# Altium PCB Kasli-DIOT.PCBDOC (part 12 of 23)
Units mm, origin at the board's own origin, x right, y up, seen from the top; angles counter-clockwise.
Board outline 222.9 x 100 mm, 10 copper layers (TopLayer, Layer 2, Layer 3, Layer 4, Layer 5, Layer 6, Layer 7, layer 8, Layer 9, BottomLayer), stack 1.564 mm thick; 977 components, 900 nets, 4676 pads, 2725 vias.
Unrouted connection lines stored in the file: 17.
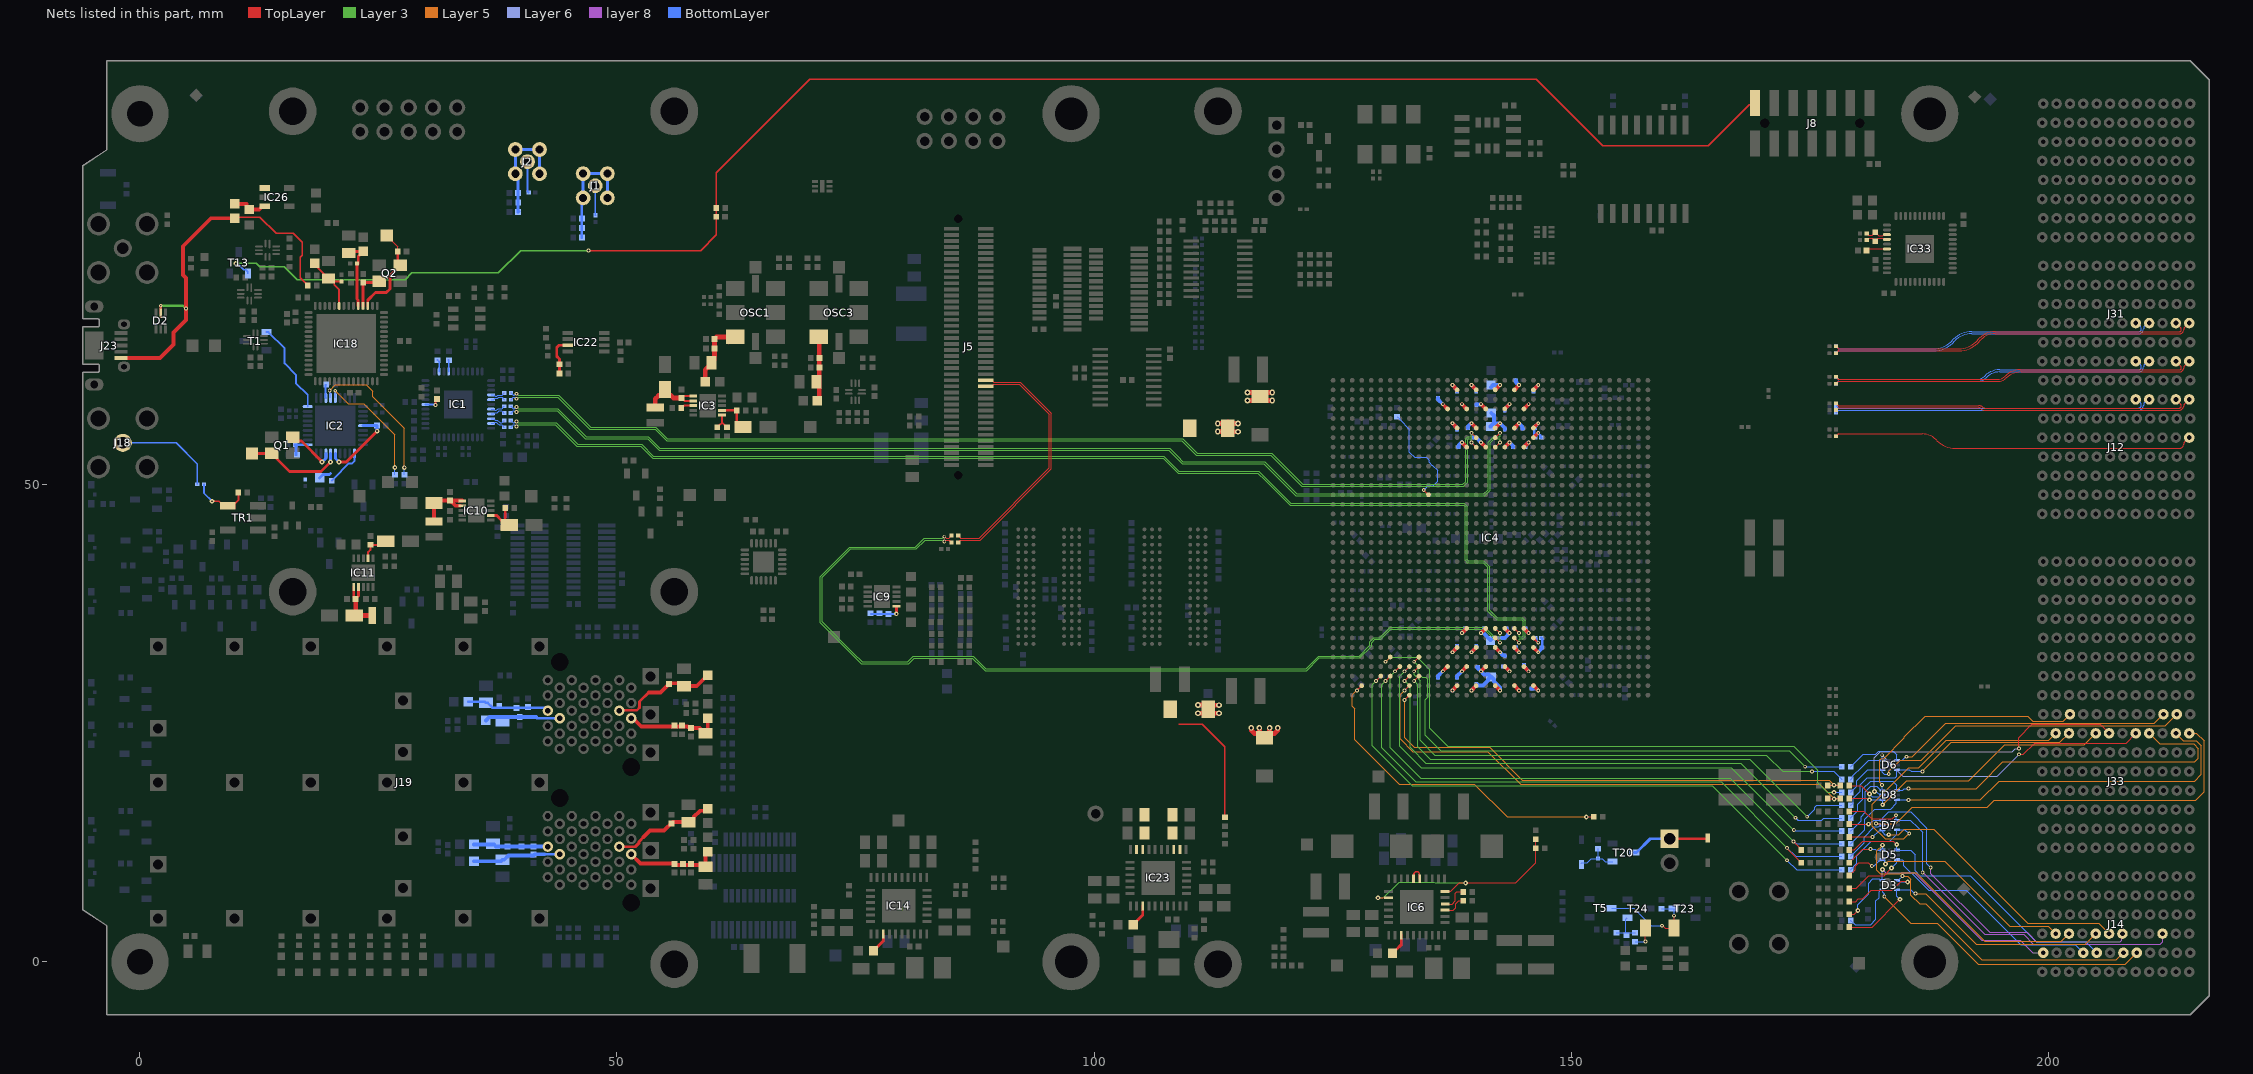
[diagram p18: the nets of this part, all layers, seen from the top]

## Via types
v1: diameter 0.4, hole 0.2, TopLayer to BottomLayer, tented both sides, 1723 vias
v2: diameter 0.5, hole 0.2, TopLayer to BottomLayer, tented both sides, 524 vias
v3: diameter 0.6, hole 0.3, TopLayer to BottomLayer, tented both sides, 172 vias
v4: diameter 0.6, hole 0.3, TopLayer to BottomLayer, 113 vias
v5: diameter 0.5, hole 0.2, TopLayer to BottomLayer, 107 vias
v6: diameter 0.4, hole 0.2, TopLayer to BottomLayer, 67 vias
v7: diameter 0.5, hole 0.25, TopLayer to BottomLayer, tented both sides, 12 vias
v8: diameter 0.8, hole 0.5, TopLayer to BottomLayer, tented both sides, 7 vias

## Nets (pads, with @x,y where several pads share a name; then routed paths per layer and width w, separated by ;. In a path a pad name is that pad's centre, name@x,y a point inside that pad or via, vN(x,y) a via of type N, cw(c..) or ccw(c..) an arc to the next point about the centre after c; other vN are vias at no path point) (continued)
MGT5_Tx_P: C142.2 J12.A5 | length 38.1
  TopLayer w0.095: C142.2@177.786,55.083 ccw(c177.786,55.143) 177.829,55.1 C142.2@177.95,55.221 ; C142.2@177.95,55.221 ccw(c177.916,55.255) 177.964,55.255 cw(c178.011,55.255) 177.978,55.289 cw(c178.078,55.188) 178.078,55.33 186.8,55.33 cw(c186.8,53.264) 188.261,54.725 188.349,54.637 ccw(c190.301,56.588) 190.301,53.828 213.797,53.828 ccw(c213.797,54.242) 214.211,54.242 cw(c214.498,54.242) 214.295,54.445 J12.A5@214.8,54.95
MGT6_RxC_N: C440.1 J12.E7 | length 33.2
  BottomLayer w0.095: C440.1@177.786,58.275 177.811,58.275 177.964,58.122 177.964,58.106 178.019,58.05 209.489,58.05 ccw(c209.489,58.35) 209.789,58.35 ccw(c209.35,58.35) 209.66,58.66 209.491,58.829 ccw(c209.2,58.538) J12.E7@209.2,58.95
MGT6_RxC_P: C436.1 J12.D7 | length 33.6
  BottomLayer w0.095: C436.1@177.786,57.565 177.811,57.565 177.986,57.74 177.986,57.772 178.042,57.828 209.489,57.828 ccw(c209.489,58.35) 210.011,58.35 cw(c210.449,58.35) 210.139,58.66 210.308,58.829 cw(c210.6,58.538) J12.D7@210.6,58.95
MGT6_Tx_N: C233.2 J12.B7 | length 37.4
  TopLayer w0.095: C233.2@177.786,58.55 177.811,58.55 177.964,58.398 177.964,58.362 178.019,58.306 192.739,58.306 cw(c192.739,57.805) 193.093,58.159 ; 193.094,58.159 ccw(c193.356,58.422) 193.356,58.05 213.797,58.05 ccw(c213.797,58.242) 213.989,58.242 ccw(c213.701,58.242) 213.905,58.445 J12.B7@213.4,58.95
MGT6_Tx_P: C229.2 J12.A7 | length 37.8
  TopLayer w0.095: C229.2@177.786,57.84 177.811,57.84 177.964,57.993 177.964,58.029 178.019,58.084 192.738,58.084 cw(c192.738,57.803) 192.937,58.002 192.938,58.001 ccw(c193.354,58.417) 193.354,57.828 213.797,57.828 ccw(c213.797,58.242) 214.211,58.242 cw(c214.498,58.242) 214.295,58.445 J12.A7@214.8,58.95
MGT7_RxC_N: C447.1 J31.E1 | length 33.5
  BottomLayer w0.095: C447.1@177.786,61.325 cw(c177.786,61.265) 177.829,61.307 177.948,61.188 cw(c177.911,61.151) 177.964,61.151 ccw(c178.016,61.151) 177.979,61.114 ccw(c178.076,61.211) 178.076,61.074 192.573,61.074 ccw(c192.573,62.188) 193.361,61.4 ; 193.361,61.4 cw(c194.93,59.832) 194.93,62.05 209.489,62.05 ccw(c209.489,62.35) 209.789,62.35 ccw(c209.35,62.35) 209.66,62.66 209.491,62.829 ccw(c209.2,62.538) J31.E1@209.2,62.95
MGT7_RxC_P: C445.1 J31.D1 | length 33.8
  BottomLayer w0.095: C445.1@177.786,60.6 ccw(c177.786,60.66) 177.829,60.618 177.948,60.737 ccw(c177.911,60.774) 177.964,60.774 cw(c178.016,60.774) 177.979,60.811 cw(c178.076,60.714) 178.076,60.852 192.574,60.852 ccw(c192.574,62.186) 193.517,61.242 ; 193.518,61.243 cw(c194.93,59.831) 194.93,61.828 209.489,61.828 ccw(c209.489,62.35) 210.011,62.35 cw(c210.449,62.35) 210.139,62.66 210.308,62.829 cw(c210.6,62.538) J31.D1@210.6,62.95
MGT7_Tx_N: C443.2 J31.B1 | length 37.6
  TopLayer w0.095: C443.2@177.786,61.325 177.811,61.325 177.964,61.173 177.964,61.129 178.019,61.074 194.737,61.074 ccw(c194.737,62.155) 195.501,61.39 cw(c197.094,59.797) 197.094,62.05 213.797,62.05 ccw(c213.797,62.242) 213.989,62.242 ccw(c213.701,62.242) 213.905,62.445 J31.B1@213.4,62.95
MGT7_Tx_P: C441.2 J31.A1 | length 38
  TopLayer w0.095: C441.2@177.786,60.6 177.811,60.6 177.964,60.753 177.964,60.796 178.019,60.852 194.829,60.852 ccw(c194.829,61.933) 195.593,61.168 cw(c197.186,59.575) 197.186,61.828 213.797,61.828 ccw(c213.797,62.242) 214.211,62.242 cw(c214.498,62.242) 214.295,62.445 J31.A1@214.8,62.95
MGT8_RxC_N: C448.1 J31.E3 | length 33.7
  BottomLayer w0.095: C448.1@177.786,64.525 cw(c177.786,64.465) 177.829,64.507 177.945,64.391 cw(c177.901,64.346) 177.964,64.346 ccw(c178.026,64.346) 177.982,64.302 ccw(c178.072,64.392) 178.072,64.265 188.035,64.265 ccw(c188.035,66.805) 189.831,65.009 190.064,65.242 cw(c192.015,63.291) 192.015,66.05 209.489,66.05 ccw(c209.489,66.35) 209.789,66.35 ccw(c209.35,66.35) 209.66,66.66 209.491,66.829 ccw(c209.2,66.538) J31.E3@209.2,66.95
MGT8_RxC_P: C446.1 J31.D3 | length 34.1
  BottomLayer w0.095: C446.1@177.786,63.782 ccw(c177.786,63.843) 177.829,63.8 177.945,63.916 ccw(c177.901,63.961) 177.964,63.961 cw(c178.026,63.961) 177.982,64.005 cw(c178.072,63.916) 178.072,64.043 188.035,64.043 ccw(c188.035,66.803) 189.987,64.851 190.22,65.084 cw(c192.016,63.288) 192.016,65.828 209.489,65.828 ccw(c209.489,66.35) 210.011,66.35 cw(c210.449,66.35) 210.139,66.66 210.308,66.829 cw(c210.6,66.538) J31.D3@210.6,66.95
MGT8_Tx_N: C444.2 J31.B3 | length 37.9
  TopLayer w0.095: C444.2@177.786,64.525 cw(c177.786,64.465) 177.829,64.507 177.945,64.391 cw(c177.901,64.346) 177.964,64.346 ccw(c178.026,64.346) 177.982,64.302 ccw(c178.072,64.392) 178.072,64.265 190.66,64.265 ccw(c190.66,66.805) 192.456,65.009 192.804,65.357 cw(c194.476,63.685) 194.476,66.05 213.797,66.05 ccw(c213.797,66.242) 213.989,66.242 ccw(c213.701,66.242) 213.905,66.445 J31.B3@213.4,66.95
MGT8_Tx_P: C442.2 J31.A3 | length 38.3
  TopLayer w0.095: C442.2@177.786,63.782 ccw(c177.786,63.843) 177.829,63.8 177.945,63.916 ccw(c177.901,63.961) 177.964,63.961 cw(c178.026,63.961) 177.982,64.005 cw(c178.072,63.916) 178.072,64.043 190.661,64.043 ccw(c190.661,66.802) 192.612,64.851 192.961,65.2 cw(c194.477,63.684) 194.477,65.828 213.797,65.828 ccw(c213.797,66.242) 214.211,66.242 cw(c214.498,66.242) 214.295,66.445 J31.A3@214.8,66.95
MGT_CLK1.CLK_N: C402.2 IC4.AH20 | length 124.6
  TopLayer w0.095: IC4.AH20@144.061,33.95 v1(144.561,33.45)
  Layer 3 w0.075: v1(39.461,56.645) 39.505,56.645 39.667,56.483 43.633,56.483 45.89,54.225 52.586,54.225 53.805,53.006 105.511,53.006 107.316,53.006 108.279,52.043 108.897,51.425 117.272,51.425 117.97,50.727 120.645,48.052 122.759,48.052 135.345,48.052 138.82,48.052 138.929,47.943 139.111,47.761 139.111,42.15 139.161,42.1 139.209,42.052 140.87,42.052 141.029,41.893 141.486,41.436 141.486,36.852 142.286,36.052 144.895,36.052 145.079,35.868 145.197,35.75 145.197,34.084 144.961,33.849 144.605,33.849 144.561,33.805 v1(144.561,33.45)
  BottomLayer w0.095: C402.2@38.878,56.732 38.903,56.732 39.056,56.579 39.056,56.548 39.112,56.493 39.253,56.493 39.405,56.645 v1(39.461,56.645)
MGT_CLK1.CLK_P: C401.2 IC4.AG20 | length 123.9
  TopLayer w0.095: IC4.AG20@144.061,34.95 v1(144.561,34.45)
  Layer 3 w0.075: v1(39.461,56.118) 39.505,56.118 39.667,56.281 43.549,56.281 45.807,54.023 52.502,54.023 53.722,52.804 107.232,52.804 108.813,51.223 117.188,51.223 117.886,50.525 120.561,47.85 122.675,47.85 135.261,47.85 138.736,47.85 138.909,47.677 138.909,42.066 139.125,41.85 140.786,41.85 141.284,41.352 141.284,36.768 142.202,35.85 144.811,35.85 144.995,35.667 144.995,34.168 144.877,34.051 144.605,34.051 144.561,34.095 v1(144.561,34.45)
  BottomLayer w0.095: C401.2@38.878,56.032 38.903,56.032 39.056,56.184 39.056,56.215 39.112,56.271 39.253,56.271 39.405,56.118 v1(39.461,56.118)
MGT_CLK1_C_N: C402.1 IC1.42 | length 1.7
  BottomLayer w0.095: IC1.42@36.811,56.928 37.105,56.928 37.244,56.789 37.453,56.789 37.69,56.552 37.69,56.548 37.746,56.493 37.945,56.493 38.001,56.548 38.001,56.579 38.153,56.732 C402.1@38.178,56.732
MGT_CLK1_C_P: C401.1 IC1.43 | length 1.7
  BottomLayer w0.095: IC1.43@36.811,56.428 37.105,56.428 37.244,56.567 37.361,56.567 37.468,56.46 37.468,56.456 37.654,56.271 37.945,56.271 38.001,56.215 38.001,56.184 38.153,56.032 C401.1@38.178,56.032
MGT_CLK2.CLK_N: C14.2 IC4.G18 | length 114.1
  TopLayer w0.095: IC4.G18@142.061,54.95 v1(142.561,55.45)
  Layer 3 w0.075: v1(39.461,58.142) 39.505,58.142 39.667,57.98 43.806,57.98 46.761,55.025 53.286,55.025 54.505,53.806 107.136,53.806 107.916,53.806 108.754,52.968 109.322,52.4 117.897,52.4 118.245,52.052 121.247,49.05 123.361,49.05 140.861,49.05 141.309,49.498 141.309,54.483 141.877,55.051 142.517,55.051 142.561,55.095 v1(142.561,55.45)
  BottomLayer w0.095: C14.2@38.878,58.232 38.903,58.232 39.056,58.079 39.056,58.045 39.112,57.99 39.253,57.99 39.405,58.142 v1(39.461,58.142)
MGT_CLK2.CLK_P: C5.2 IC4.H18 | length 114.1
  TopLayer w0.095: IC4.H18@142.061,53.95 v1(142.561,54.45)
  Layer 3 w0.075: v1(39.461,57.615) 39.505,57.615 39.667,57.778 43.723,57.778 46.677,54.823 53.202,54.823 54.422,53.604 107.832,53.604 109.238,52.198 117.813,52.198 118.161,51.85 121.163,48.848 126.361,48.848 140.945,48.848 141.511,49.414 141.511,54.399 141.961,54.849 142.517,54.849 142.561,54.805 v1(142.561,54.45)
  BottomLayer w0.095: C5.2@38.878,57.526 38.903,57.526 39.056,57.678 39.056,57.712 39.112,57.768 39.253,57.768 39.405,57.615 v1(39.461,57.615)
MGT_CLK2_C_N: C14.1 IC1.40 | length 1.6
  BottomLayer w0.095: IC1.40@36.811,57.928 37.105,57.928 37.244,57.789 37.361,57.789 37.561,57.99 37.945,57.99 38.001,58.045 38.001,58.079 38.153,58.232 C14.1@38.178,58.232
MGT_CLK2_C_P: C5.1 IC1.41 | length 1.6
  BottomLayer w0.095: IC1.41@36.811,57.428 37.105,57.428 37.244,57.567 37.453,57.567 37.653,57.768 37.945,57.768 38.001,57.712 38.001,57.678 38.153,57.526 C5.1@38.178,57.526
MGT_CLK3.CLK_N: C479.2 IC4.G16 | length 110.6
  TopLayer w0.095: v1(139.561,55.45) IC4.G16@140.061,54.95
  Layer 3 w0.075: v1(39.461,59.544) 39.505,59.544 39.667,59.381 43.89,59.381 47.247,56.025 54.072,56.025 55.291,54.806 64.268,54.806 65.558,54.806 65.584,54.807 cw(c65.589,54.733) 65.606,54.806 65.692,54.806 65.854,54.806 108.061,54.806 109.291,54.806 110.029,54.068 110.797,53.3 118.611,53.3 121.872,50.039 138.666,50.039 138.959,50.333 138.959,54.846 139.164,55.051 139.517,55.051 139.561,55.095 v1(139.561,55.45)
  BottomLayer w0.095: C479.2@38.883,59.637 38.908,59.637 39.06,59.484 39.06,59.447 39.116,59.391 39.253,59.391 39.405,59.544 v1(39.461,59.544)
MGT_CLK3.CLK_P: C421.2 IC4.H16 | length 110.6
  TopLayer w0.095: v1(139.561,54.45) IC4.H16@140.061,53.95
  Layer 3 w0.075: v1(39.461,59.017) 39.505,59.017 39.667,59.179 43.807,59.179 47.163,55.823 53.988,55.823 55.207,54.604 65.558,54.604 108.061,54.604 109.207,54.604 109.957,53.854 110.713,53.098 118.527,53.098 121.788,49.837 138.749,49.837 139.161,50.249 139.161,54.762 139.248,54.849 139.517,54.849 139.561,54.805 v1(139.561,54.45)
  BottomLayer w0.095: C421.2@38.883,58.924 38.908,58.924 39.06,59.077 39.06,59.114 39.116,59.169 39.253,59.169 39.405,59.017 v1(39.461,59.017)
MGT_CLK3_C_N: C479.1 IC1.37 | length 1.6
  BottomLayer w0.095: IC1.37@36.811,59.428 37.105,59.428 37.244,59.289 37.406,59.289 37.508,59.391 37.95,59.391 38.005,59.447 38.005,59.484 38.158,59.637 C479.1@38.183,59.637
MGT_CLK3_C_P: C421.1 IC1.38 | length 1.6
  BottomLayer w0.095: IC1.38@36.811,58.928 37.105,58.928 37.244,59.067 37.498,59.067 37.6,59.169 37.95,59.169 38.005,59.114 38.005,59.077 38.158,58.924 C421.1@38.183,58.924
MGT_CLK_ext_C_N: C395.2 IC4.AH18 | length 97.8
  TopLayer w0.095: v6(84.311,44.562) 84.38,44.562 84.519,44.423 84.828,44.423 84.883,44.479 84.883,44.518 85.036,44.671 C395.2@85.061,44.671 ; IC4.AH18@142.061,33.95 v1(142.561,33.45)
  Layer 3 w0.075: v6(84.311,44.562) 84.254,44.562 84.105,44.413 82.213,44.413 81.277,43.477 74.402,43.477 71.309,40.384 71.309,35.541 74.768,32.082 75.602,31.248 80.559,31.248 81.151,31.84 87.26,31.84 88.068,31.032 88.577,30.523 122.309,30.523 123.634,31.848 127.875,31.848 129.1,33.074 129.1,33.467 129.421,33.787 130.049,33.787 131.111,34.85 140.884,34.85 141.885,33.849 142.11,33.849 142.517,33.849 142.561,33.805 v1(142.561,33.45)
MGT_CLK_ext_C_P: C394.2 IC4.AG18 | length 97.2
  TopLayer w0.095: v6(84.311,44.062) 84.38,44.062 84.519,44.201 84.828,44.201 84.883,44.145 84.883,44.106 85.036,43.953 C394.2@85.061,43.953 ; IC4.AG18@142.061,34.95 v1(142.561,34.45)
  Layer 3 w0.075: v6(84.311,44.062) 84.254,44.062 84.105,44.211 82.297,44.211 81.361,43.275 74.486,43.275 71.511,40.3 71.511,35.625 74.768,32.368 75.686,31.45 80.475,31.45 81.068,32.042 87.344,32.042 88.068,31.318 88.661,30.725 122.225,30.725 123.55,32.05 127.791,32.05 128.898,33.158 128.898,33.55 129.338,33.99 129.965,33.99 131.027,35.052 140.968,35.052 141.969,34.051 142.194,34.051 142.517,34.051 142.561,34.095 v1(142.561,34.45)
MGT_CLK_ext_N: C395.1 J5.53 | length 26.4
  TopLayer w0.095: C395.1@85.761,44.671 85.786,44.671 85.938,44.518 85.938,44.479 85.994,44.423 87.97,44.423 95.311,51.764 95.311,57.4 92.182,60.529 89.467,60.529 89.261,60.323 J5.53@88.661,60.323
MGT_CLK_ext_P: C394.1 J5.51 | length 27.1
  TopLayer w0.095: C394.1@85.761,43.953 85.786,43.953 85.938,44.106 85.938,44.145 85.994,44.201 88.062,44.201 95.533,51.672 95.533,57.492 92.274,60.751 89.467,60.751 89.261,60.958 J5.51@88.661,60.958
MGTAVCC: C303.2 C304.2 C385.2 C386.2 FB3.1 FB4.1 IC23.8 IC23.9 IC23.14 IC23.15 R5.2 | length 13.2
  TopLayer w0.15: 108.886,24.9 111.361,24.9 113.711,22.55 R5.2@113.711,15.17
MGTAVCC_G10: C50.2 C320.2 C322.2 C323.2 C324.2 C325.2 C326.2 C327.2 C330.2 C331.2 FB3.2 IC4.AG15 IC4.AG17 IC4.AG19 IC4.AG21 IC4.AJ14 IC4.AJ16 IC4.AJ18 IC4.AJ20 | length 23.1
  TopLayer w0.4: v1(137.561,32.45) IC4.AJ14@138.061,32.95 ; v1(138.561,34.45) IC4.AG15@139.061,34.95 ; v1(139.561,32.45) IC4.AJ16@140.061,32.95 ; v1(140.561,34.45) IC4.AG17@141.061,34.95 ; IC4.AJ18@142.061,32.95 v1(142.561,32.45) ; IC4.AG19@143.061,34.95 v1(143.561,34.45) ; IC4.AJ20@144.061,32.95 v1(144.561,32.45) ; IC4.AG21@145.061,34.95 v1(145.561,34.45)
  TopLayer w0.5: v3(110.894,26.061) FB3.2@111.694,26.061 ; v3(110.894,26.911) FB3.2@111.694,26.911 ; FB3.2@112.311,26.052 v3(113.111,26.052) ; FB3.2@112.311,26.902 v3(113.111,26.902)
  BottomLayer w0.4: v3(110.894,26.061) 111.37,26.061 111.659,26.35 111.661,26.35 C50.2@111.936,26.625 ; v3(110.894,26.911) 110.932,26.872 111.689,26.872 C50.2@111.936,26.625 ; v3(113.111,26.052) 112.527,26.052 112.23,26.35 112.211,26.35 C50.2@111.936,26.625 ; v3(113.111,26.902) 112.566,26.902 112.564,26.9 112.211,26.9 C50.2@111.936,26.625 ; v1(137.561,32.45) 138.061,32.95 C331.2@138.061,33.1 ; v1(138.561,34.45) 138.886,34.775 138.886,34.95 C330.2@138.911,34.95 ; v1(139.561,32.45) 140.088,32.977 C322.2@140.088,33.1 ; v1(140.561,34.45) 140.813,34.45 C320.2@141.563,33.7 141.813,33.95 143.061,33.95 v1(143.561,34.45) 143.236,34.775 143.236,34.95 C326.2@143.211,34.95 ; v1@140.699,34.563 140.886,34.75 140.886,34.95 C327.2@140.911,34.95 ; v1(142.561,32.45) 142.886,32.125 143.061,32.125 C324.2@143.061,32.1 ; C323.2@144.226,32.935 144.226,32.785 v1(144.561,32.45) ; C325.2@145.211,34.95 145.236,34.95 145.236,34.775 v1(145.561,34.45)
MGTAVCC_G11: C319.2 C332.2 C340.2 C341.2 C342.2 C343.2 C344.2 C345.2 C349.2 C350.2 FB4.2 IC4.F14 IC4.F16 IC4.F18 IC4.F20 IC4.H15 IC4.H17 IC4.H19 IC4.H21 | length 18
  TopLayer w0.4: v1(137.561,56.45) IC4.F14@138.061,55.95 ; v1(138.561,54.45) IC4.H15@139.061,53.95 ; v1(139.561,56.45) IC4.F16@140.061,55.95 ; v1(140.561,54.45) IC4.H17@141.061,53.95 ; IC4.F18@142.061,55.95 v1(142.561,56.45) ; IC4.H19@143.061,53.95 v1(143.561,54.45) ; IC4.F20@144.061,55.95 v1(144.561,56.45) ; IC4.H21@145.061,53.95 v1(145.561,54.45)
  TopLayer w0.5: v3(112.969,55.586) FB4.2@113.769,55.586 ; v3(112.969,56.436) FB4.2@113.769,56.436 ; FB4.2@114.036,56.575 114.184,56.427 FB4.2@114.386,56.427 ; FB4.2@114.303,55.564 v3(115.103,55.564) ; FB4.2@114.303,56.414 v3(115.103,56.414) ; FB4.2@114.386,55.577 FB4.2@114.386,56.065
  BottomLayer w0.4: v1(137.561,56.45) 138.061,55.95 C344.2@138.061,55.8 ; C340.2@138.211,53.95 138.236,53.95 138.236,54.162 v1@138.551,54.477 ; C350.2@139.211,55.956 139.211,56.131 139.53,56.45 v1(139.561,56.45) ; C345.2@139.811,54.95 140.061,54.95 v1(140.561,54.45) ; C332.2@141.561,56.1 C332.2@141.836,56.375 ; C319.2@141.636,57.525 141.911,57.25 141.911,56.45 v1(142.561,56.45) 143.061,55.95 C349.2@143.061,55.8 ; v1(143.561,54.45) 143.736,54.274 143.886,54.124 143.886,53.95 C341.2@143.911,53.95 ; v1(144.561,56.45) 144.883,56.128 144.883,55.881 C343.2@144.908,55.881 ; C342.2@145.211,53.99 145.211,54.126 145.535,54.45 v1(145.561,54.45)
MGTAVTT_G10: C97.2 C101.2 C112.2 C113.2 C114.2 C115.2 C116.2 C328.2 C329.2 FB2.2 IC4.AJ22 IC4.AL13 IC4.AL15 IC4.AL17 IC4.AL19 IC4.AL21 IC4.AN14 IC4.AN16 IC4.AN18 IC4.AN20 IC4.AN22 R160.2 | length 24.5
  TopLayer w0.4: v1(136.561,30.45) IC4.AL13@137.061,30.95 ; v1(137.561,28.45) IC4.AN14@138.061,28.95 ; v1(138.561,30.45) IC4.AL15@139.061,30.95 ; v1(139.561,28.45) IC4.AN16@140.061,28.95 ; v1(140.561,30.45) IC4.AL17@141.061,30.95 ; IC4.AN18@142.061,28.95 v1(142.561,28.45) ; IC4.AL19@143.061,30.95 v1(143.561,30.45) ; IC4.AN20@144.061,28.95 v1(144.561,28.45) ; IC4.AL21@145.061,30.95 v1(145.561,30.45) ; IC4.AN22@146.061,28.95 v1(146.561,28.45) ; IC4.AJ22@146.061,32.95 v1(146.561,32.45)
  TopLayer w0.5: v3(116.484,24.525) 116.503,24.506 116.503,24.249 116.827,23.925 117.211,23.925 FB2.2@117.334,23.802 ; FB2.2@117.334,23.795 v3(117.334,24.525) ; v3(118.409,24.525) 118.409,23.774 118.409,23.823 118.511,23.925 118.916,23.925 119.24,24.249 119.24,24.479 119.267,24.506 v3@119.278,24.506
  BottomLayer w0.254: C113.2@146.886,32.772 146.988,32.874 146.988,33.867 146.905,33.95 R160.2@146.891,33.95
  BottomLayer w0.4: C116.2@136.061,29.8 136.061,29.95 v1(136.561,30.45) ; C114.2@138.061,29.8 138.061,29.95 v1(138.561,30.45) ; v1(139.561,28.45) 140.061,28.95 C115.2@140.061,29.075 ; C115.2@140.061,29.1 C115.2@140.061,29.075 ; C112.2@140.211,30.925 140.236,30.925 140.236,30.751 140.537,30.45 v1(140.561,30.45) 140.886,30.125 141.338,30.125 C101.2@141.613,29.85 ; v1(142.561,28.45) 142.561,28.743 141.938,29.366 141.938,29.575 141.663,29.85 C101.2@141.613,29.85 ; C329.2@142.911,30.95 143.061,30.95 v1(143.561,30.45) ; C97.2@145.061,31.1 145.061,30.95 v1(145.561,30.45) ; C328.2@145.861,28.65 145.861,28.625 146.386,28.625 v1(146.561,28.45) ; v1(146.561,32.45) 146.564,32.45 C113.2@146.886,32.772 ; C115.2@140.061,29.075 140.229,29.075 140.354,28.95 140.768,28.95 141.288,29.47 141.288,29.575 141.563,29.85 C101.2@141.613,29.85
  other v3: 119.259,24.525
MGTAVTT_G11: C321.2 C333.2 C334.2 C335.2 C336.2 C337.2 C338.2 C347.2 C348.2 FB1.2 IC4.B14 IC4.B16 IC4.B18 IC4.B20 IC4.B22 IC4.D13 IC4.D15 IC4.D17 IC4.D19 IC4.D21 IC4.F22 R161.2 | length 19.3
  TopLayer w0.4: v1(136.561,58.45) IC4.D13@137.061,57.95 ; v1(137.561,60.45) IC4.B14@138.061,59.95 ; v1(138.561,58.45) IC4.D15@139.061,57.95 ; v1(139.561,60.45) IC4.B16@140.061,59.95 ; v1(140.561,58.45) IC4.D17@141.061,57.95 ; IC4.B18@142.061,59.95 v1(142.561,60.45) ; IC4.D19@143.061,57.95 v1(143.561,58.45) ; IC4.B20@144.061,59.95 v1(144.561,60.45) ; IC4.D21@145.061,57.95 v1(145.561,58.45) ; IC4.F22@146.061,55.95 v1(146.561,56.45) ; IC4.B22@146.061,59.95 v1(146.561,60.45)
  TopLayer w0.5: v3@116.244,58.836 FB1.2@117.044,58.836 ; v3@116.244,59.686 FB1.2@117.044,59.686 ; FB1.2@117.886,58.827 v3(118.686,58.827) ; FB1.2@117.886,59.677 v3(118.686,59.677)
  BottomLayer w0.254: C338.2@146.211,55.95 146.207,55.95 146.134,55.877 146.134,55.033 146.217,54.95 R161.2@146.231,54.95
  BottomLayer w0.4: C334.2@136.061,59.1 136.061,58.95 v1(136.561,58.45) ; v1(137.561,60.45) 138.061,59.95 C333.2@138.061,59.8 ; v1(139.561,60.45) 140.061,59.95 C336.2@140.061,59.8 ; C337.2@140.061,58.4 140.061,58.412 140.523,58.412 v1(140.561,58.45) ; C321.2@141.611,60.225 141.836,60.45 v1(142.561,60.45) ; C335.2@143.061,57.8 143.061,57.95 v1(143.561,58.45) ; C348.2@144.211,60.95 144.236,60.95 144.236,60.783 144.291,60.728 144.291,60.684 144.525,60.45 v1(144.561,60.45) ; C347.2@146.061,59.8 146.061,59.95 v1(146.561,60.45) ; C338.2@146.211,55.95 146.236,55.95 146.236,56.125 v1(146.561,56.45)
  other v3: 116.094,58.836 116.094,59.686
MON-bus.F_IO0: IC4.AM6 R272.1 | length 62.3
  TopLayer w0.127: v1(129.561,29.45) IC4.AM6@130.061,29.95
  Layer 3 w0.127: v1(129.561,29.45) 129.17,29.059 129.17,22.638 133.348,18.461 164.824,18.461 v1(172.635,10.65)
  BottomLayer w0.125: v1(172.635,10.65) 173.636,9.65 R272.1@178.391,9.65
MON-bus.F_IO1: IC4.AL9 R271.1 | length 59
  TopLayer w0.127: v1(132.561,30.45) IC4.AL9@133.061,30.95
  Layer 3 w0.127: v1(132.561,30.45) 132.061,29.95 132.061,22.6 134.311,20.35 166.818,20.35 v1(173.352,13.816)
  BottomLayer w0.125: v1(173.352,13.816) 173.426,13.816 173.524,13.718 R271.1@178.391,13.718
  BottomLayer w0.127: v1(173.352,13.816) 173.393,13.775 173.436,13.775 v1@173.509,13.702
MON-bus.F_RST: IC4.AM10 R270.1 | length 55.9
  TopLayer w0.127: v1(133.561,29.45) IC4.AM10@134.061,29.95
  Layer 3 w0.127: v1(133.561,29.45) 133.951,29.059 133.951,22.535 135.24,21.246 168.717,21.246 v1(174.756,15.208)
  BottomLayer w0.125: v1(174.756,15.208) 175.525,15.977 175.525,16.2 175.736,16.411 R270.1@178.391,16.411
MON-bus.M_SCL: IC4.AM7 R262.1 R295.1 | length 63.1
  TopLayer w0.127: v1(130.561,29.45) IC4.AM7@131.061,29.95 ; v1(172.635,11.95) 172.635,11.881 173.888,10.629 173.908,10.629 174.134,10.403 R295.1@174.134,10.383
  Layer 3 w0.127: v1(130.561,29.45) 130.136,29.025 130.136,22.45 133.736,18.85 165.761,18.85 172.635,11.976 v1(172.635,11.95)
  BottomLayer w0.125: v1(172.635,11.95) 173.536,11.05 R262.1@178.391,11.05
MON-bus.M_SDA: IC4.AL8 R263.1 R296.1 | length 62.1
  TopLayer w0.127: v1(131.561,30.45) IC4.AL8@132.061,30.95 ; v1(173.309,12.627) 173.915,12.021 173.915,11.957 R296.1@174.141,11.731
  Layer 3 w0.127: v1(131.561,30.45) 131.036,29.925 131.036,22.45 134.236,19.25 166.686,19.25 v1(173.309,12.627)
  BottomLayer w0.125: v1(173.309,12.627) 173.344,12.627 173.6,12.371 R263.1@178.391,12.371
  BottomLayer w0.127: v1(173.309,12.627) 173.309,12.623 173.58,12.351
MON-bus.P_IO0: IC4.AK10 R288.1 | length 54.4
  TopLayer w0.127: v1(133.561,31.45) IC4.AK10@134.061,31.95
  Layer 3 w0.127: v1(133.561,31.45) 133.986,31.025 133.986,30.239 134.411,29.813 134.751,29.813 134.97,29.594 134.97,27.713 134.711,27.453 134.711,23.725 136.336,22.1 172.898,22.1 v1(174.545,20.453)
  BottomLayer w0.125: v1(174.545,20.453) 178.388,20.453 R288.1@178.391,20.45
MON-bus.P_IO1: IC4.AM9 R266.1 | length 56.8
  TopLayer w0.127: v1(132.561,29.45) IC4.AM9@133.061,29.95
  Layer 3 w0.127: v1(132.561,29.45) 133.136,28.875 133.136,22.475 134.792,20.819 167.792,20.819 v1(173.514,15.097)
  BottomLayer w0.125: v1(173.514,15.097) 173.559,15.097 173.811,14.845 176.275,14.845 176.494,15.064 R266.1@178.391,15.064
  BottomLayer w0.127: v1(173.514,15.097) 173.788,14.823
MON-bus.P_IO2: IC4.AL10 R267.1 | length 54.1
  TopLayer w0.127: v1(133.561,30.45) IC4.AL10@134.061,30.95
  Layer 3 w0.127: v1(133.561,30.45) 133.561,30.1 134.184,29.477 134.184,23.202 135.713,21.673 170.488,21.673 172.211,19.95 v1(175.261,19.95)
  BottomLayer w0.125: v1(175.261,19.95) 177.545,19.95 178.144,19.351 178.164,19.351 178.391,19.124 R267.1@178.391,19.104
MON-bus.P_PRES0_N: IC4.AP9 R85.1 R268.1 | length 53.1
  TopLayer w0.127: v1(132.561,27.45) IC4.AP9@133.061,27.95 ; R85.1@176.926,18.473 176.966,18.513 178.196,18.513 R268.1@178.236,18.473
  Layer 5 w0.127: v1(132.561,27.45) 132.561,23.5 133.589,22.472 141.464,22.472 144.911,19.025 177.058,19.025 v2(177.571,18.513)
MON-bus.P_PRES1_N: IC4.AN9 R92.1 R269.1 | length 55.4
  TopLayer w0.127: v1(132.561,28.45) IC4.AN9@133.061,28.95 ; R92.1@176.926,17.124 176.974,17.076 v2(177.581,17.076) ; v2@177.581,17.124 R269.1@178.236,17.124
  Layer 5 w0.127: v1(132.561,28.45) 132.086,27.975 132.086,23.371 133.412,22.045 141.287,22.045 144.734,18.598 176.08,18.598 177.581,17.097 v2(177.581,17.076)
MON-bus.P_RST: IC4.AK7 R287.1 | length 59
  TopLayer w0.127: v1(130.561,31.45) IC4.AK7@131.061,31.95
  Layer 3 w0.127: v1(130.561,31.45) 131.031,31.92 133.871,31.92 135.197,30.594 135.197,24.463 137.061,22.6 173.361,22.6 175.886,20.075 175.886,18.747 176.869,17.765 v2(177.564,17.765)
  BottomLayer w0.125: v2(177.564,17.765) 177.572,17.757 R287.1@178.391,17.757
NetC9_1: C9.1 C12.2 IC3.1 IC3.2 L3.2 | length 7.2
  TopLayer w0.2: IC3.2@58.011,58.8 57.061,58.8 C12.2@56.761,59.1 56.961,59.3 IC3.1@58.011,59.3
  TopLayer w0.5: L3.2@54.011,58.1 54.011,59 54.361,59.35 54.636,59.35 C9.1@55.011,59.725 ; C9.1@55.011,60 C9.1@55.011,59.725 ; C12.2@56.761,59.1 55.911,59.1 55.661,59.35 55.386,59.35 C9.1@55.011,59.725
NetC13_1: C13.1 C15.2 IC11.1 IC11.2 L23.2 | length 6.4
  TopLayer w0.3: IC11.1@22.411,39.287 22.411,38.237 C15.2@22.611,38.037 22.911,38.337 IC11.2@22.911,39.287
  TopLayer w0.5: C15.2@22.611,38.037 22.611,36.437 C13.1@22.461,36.287 L23.2@24.361,36.287
NetC19_1: C19.1 IC3.7 R10.2 | length 3.7
  TopLayer w0.25: IC3.7@61.011,57.8 R10.2@62.541,57.8 62.541,56.55 63.041,56.05 C19.1@63.211,56.05
NetC20_2: C20.2 J1.1 | length 3.1
  BottomLayer w0.19: J1.1@47.72,81.346 47.728,81.338 47.728,78.258 C20.2@47.736,78.25
NetC21_2: C21.2 J2.1 | length 4.3
  BottomLayer w0.19: 40.615,81.433 40.615,82.321 ; J2.1@40.615,83.871 40.615,82.321 ; C21.2@40.615,80.771 40.615,81.325 40.615,82.321 ; C21.2@40.615,80.771 40.615,80.755 40.72,80.65 C21.2@40.736,80.65 C21.2@40.615,80.771
NetC23_2: C23.2 C24.2 C25.2 C26.2 IC2.5 IC2.10 IC2.32 L2.1 | length 12.2
  TopLayer w0.3: v2(20.864,52.389) 21.626,52.389 v2(24.859,55.622)
  BottomLayer w0.3: C23.2@16.361,53.151 16.361,54.067 C25.2@16.261,54.167 16.293,54.199 IC2.10@17.583,54.199 ; L2.1@18.832,50.726 19.182,51.076 19.862,51.076 19.961,51.175 ; IC2.5@20.483,53.299 20.483,52.77 v2(20.864,52.389) ; IC2.32@23.383,56.199 C24.2@24.859,56.199 v2(24.859,55.622)
NetC43_2: C43.2 C44.2 J1.2 R29.2 | length 11.3
  BottomLayer w0.3: C43.2@46.311,75.924 46.311,77.925 46.311,79.437 J1.2@46.45,79.576 ; J1.2@46.45,80.076 J1.2@46.45,82.616 J1.2@48.99,82.616 J1.2@48.99,80.076
NetC45_1: C45.1 IC11.7 R25.2 | length 3
  TopLayer w0.2: IC11.7@23.911,42.287 23.911,42.94 24.15,43.179 R25.2@24.15,43.695 25.124,43.695 C45.1@25.515,44.086
NetC46_2: C46.2 C47.2 J2.2 R30.2 | length 11.9
  BottomLayer w0.3: C46.2@39.727,78.666 C46.2@39.636,78.574 39.636,82.31 J2.2@39.345,82.601 J2.2@39.345,85.141 J2.2@41.885,85.141 J2.2@41.885,82.601
NetC49_2: C49.2 IC1.17 | length 1.7
  TopLayer w0.2: v1(30.961,58.375) 30.961,58.975 C49.2@30.986,59
  BottomLayer w0.2: IC1.17@29.911,58.428 29.93,58.409 30.927,58.409 v1(30.961,58.375)
NetC53_2: C53.2 J8.13 R58.1 T13.1 | length 179
  TopLayer w0.15: v1(47.011,74.55) 58.761,74.55 60.411,76.2 60.411,82.725 62.486,84.8 70.209,92.523 146.338,92.523 153.311,85.55 164.386,85.55 168.686,89.85 J8.13@169.286,89.85
  Layer 3 w0.15: v2(10.036,73.2) 12.211,73.2 12.536,72.875 15.111,72.875 16.486,71.5 27.786,71.5 28.511,72.225 37.561,72.225 39.886,74.55 v1(47.011,74.55)
  BottomLayer w0.15: v2(10.036,73.2) 10.103,73.133 10.303,73.133 10.902,72.534 11.086,72.534 11.311,72.309 T13.1@11.311,72.125
NetC159_1: C159.1 D17.2 R150.1 T20.1 | length 4.6
  BottomLayer w0.1: D17.2@151.086,10.341 151.118,10.374 151.717,10.374 152.144,10.8 152.836,10.8 152.851,10.785 153.278,10.785 153.563,10.5 T20.1@154.361,10.5 ; C159.1@152.836,10.825 R150.1@152.836,11.855
NetC175_2: C175.2 IC9.1 R128.2 R129.2 | length 3.5
  TopLayer w0.3: v2(79.28,36.475) IC9.1@79.28,37.275
  BottomLayer w0.2: R128.2@76.625,36.475 77.505,36.475 C175.2@78.48,36.475 v2(79.28,36.475)
NetC179_2: C179.2 C180.2 C181.2 C182.2 J19.LB15 L20.2 | length 8.9
  BottomLayer w0.25: L20.2@34.411,27.25 36.161,27.25 C179.2@36.261,27.15 36.436,27.15 36.936,26.65 42.39,26.65 42.72,26.32 J19.LB15@42.911,26.32
NetC183_2: C183.2 C184.2 J19.LB16 L21.2 | length 8.1
  BottomLayer w0.25: 41.511,25.65 41.511,25.625 41.586,25.55 41.702,25.55 41.732,25.52 J19.LB16@44.161,25.52
  BottomLayer w0.4: L21.2@36.261,25.3 36.611,25.65 38.011,25.65 C183.2@39.811,25.65 41.511,25.65
NetC187_2: C187.2 IC6.25 | length 2.3
  TopLayer w0.3: C187.2@131.301,0.89 131.301,0.915 131.626,1.24 131.651,1.24 132.198,1.788 IC6.25@132.198,2.78
NetC202_2: C202.2 IC26.1 IC26.3 L22.2 | length 2.8
  TopLayer w0.4: L22.2@9.912,79.44 11.195,79.44 ; C202.2@11.461,78.85 12.477,78.85 12.711,79.084 12.711,79.1 IC26.3@12.811,79.2
NetC207_2: C207.2 IC18.3 Q2.1 TP15.1 | length 9.8
  TopLayer w0.125: TP15.1@25.861,76.125 27.018,74.968 C207.2@27.018,74.46
  TopLayer w0.3: IC18.3@23.876,68.758 23.876,69.344 24.674,70.142 25.817,70.142 26.198,70.523 26.198,71.924 27.018,72.744 27.018,73.024 C207.2@27.018,74.46
NetC208_2: C208.2 IC18.4 Q2.3 | length 4
  TopLayer w0.3: IC18.4@23.376,68.758 C208.2@23.376,71.188 ; C208.2@23.404,71.216 Q2.3@24.99,71.216
NetC209_2: C209.2 C210.2 IC18.5 L24.2 | length 7.5
  TopLayer w0.3: C209.2@21.88,74.422 21.93,74.472 L24.2@23.404,74.472 22.876,73.944 C210.2@22.876,73.19 ; C210.2@22.738,73.19 22.738,69.506 22.869,69.375 22.869,68.765 IC18.5@22.876,68.758
NetC211_2: C211.2 C212.2 IC18.9 L25.2 | length 5.7
  TopLayer w0.2: L25.2@18.324,73.202 18.324,73.062 19.736,71.65 C211.2@19.761,71.65 ; IC18.9@20.876,68.758 20.846,68.788 20.846,70.475 20.361,70.96 20.361,71.316 C212.2@21.118,71.316
NetC220_1: C220.1 IC22.7 R241.2 | length 4.1
  TopLayer w0.3: R241.2@43.973,61.683 43.973,63.188 43.686,63.475 43.686,64.4 43.911,64.625 IC22.7@44.861,64.625
NetC225_1: C225.1 C278.2 IC10.1 IC10.2 L35.2 | length 6.3
  TopLayer w0.25: IC10.1@33.736,48.275 IC10.1@33.761,48.3
  TopLayer w0.4: L35.2@30.802,46.15 C225.1@30.802,48.08 31.072,48.35 C278.2@32.511,48.35 ; IC10.2@33.561,47.807 33.054,47.807 C278.2@32.511,48.35 ; IC10.1@33.749,48.35 C278.2@32.511,48.35
NetC226_2: C226.2 C287.2 C288.2 L36.2 OSC1.6 | length 8
  TopLayer w0.095: OSC1.6@61.686,64.76 OSC1.6@62.411,65.485
  TopLayer w0.5: L36.2@59.261,61.05 59.261,62.057 59.554,62.35 59.636,62.35 59.911,62.625 C288.2@59.911,62.8 60.186,63.075 60.186,63.518 60.211,63.543 C226.2@60.211,65.3 60.396,65.485 OSC1.6@62.411,65.485
NetC228_1: C228.1 J18.1 | length 10.8
  BottomLayer w0.19: J18.1@-1.8,54.4 3.78,54.4 6,52.18 C228.1@6,50.05
NetC228_2: C228.2 R80.1 TR1.6 | length 6.6
  TopLayer w0.19: v2(7.561,48.28) 8.281,48.28 8.466,48.095 8.466,48.08 8.999,47.547 9.926,47.547 9.926,47.992 10.316,48.383 R80.1@10.316,49.197
  BottomLayer w0.19: C228.2@6.7,50.05 6.7,49.141 v2(7.561,48.28)
NetC260_2: C260.2 C261.2 C262.2 C263.2 J19.LT15 L30.2 | length 10
  TopLayer w0.4: J19.LT15@51.661,25.525 52.536,24.65 56.011,24.65 56.761,24.65 57.417,24.65 57.457,24.61 57.651,24.61 C261.2@57.761,24.5 58.671,24.5 58.736,24.435 58.736,24.3 59.086,23.95 C260.2@59.261,23.95 59.511,24.2 L30.2@59.511,25.55
NetC264_2: C264.2 C265.2 J19.LT16 L31.2 | length 11.4
  TopLayer w0.25: J19.LT16@50.25,26.325 50.275,26.35 52.074,26.35 52.374,26.65
  TopLayer w0.3: 52.374,26.65 52.374,27.288 53.323,28.238
  TopLayer w0.4: 53.323,28.238 54.573,28.238 55.511,29.175 55.511,29.2 56.711,29.2 C264.2@57.011,28.9 58.361,28.9 L31.2@59.511,30.05
NetC268_2: C268.2 C269.2 C270.2 C271.2 J19.RB15 L32.2 | length 8.2
  BottomLayer w0.25: C268.2@37.011,12.4 37.111,12.3 37.311,12.1 C268.2@37.341,12.07
  BottomLayer w0.4: L32.2@35.011,12.3 C268.2@37.111,12.3 ; C268.2@37.311,12.1 C269.2@38.511,12.1 42.881,12.1 J19.RB15@42.911,12.07
NetC272_2: C272.2 C273.2 J19.RB16 L33.2 | length 9.3
  BottomLayer w0.25: 42.386,11.275 J19.RB16@44,11.275
  BottomLayer w0.4: L33.2@35.011,10.55 37.861,10.55 C272.2@38.011,10.7 38.186,10.7 38.636,11.15 41.261,11.15 41.261,11.175 41.286,11.175 41.286,11.19 41.371,11.275 42.386,11.275
NetC274_2: C274.2 C275.2 C277.2 C281.2 J19.RT15 L19.2 | length 10.1
  TopLayer w0.4: J19.RT15@51.5,11.275 52.476,10.299 56.011,10.299 56.011,10.15 56.761,10.15 59.061,10.15 C274.2@59.261,9.95 59.261,11.3 L19.2@59.511,11.55
NetC280_2: C280.2 C412.2 J19.RT16 L34.2 | length 10.9
  TopLayer w0.25: J19.RT16@50.411,12.07 51.914,12.07
  TopLayer w0.3: 51.914,12.07 52.324,12.48 52.324,12.629 52.77,13.075
  TopLayer w0.4: 52.786,13.075 53.461,13.75 54.93,13.75 55.855,14.675 55.928,14.675 55.953,14.65 C280.2@57.511,14.65 57.686,14.65 58.036,15 58.036,15.175 58.687,15.826 59.287,15.826 L34.2@59.511,16.05
NetC286_1: C286.1 IC10.7 R255.2 | length 3.1
  TopLayer w0.3: IC10.7@36.761,46.8 37.38,46.8 37.905,46.275 38.236,46.275 38.291,46.22 R255.2@38.291,47.55
NetC289_2: C289.2 C290.2 C291.2 L37.2 OSC3.6 | length 7.5
  TopLayer w0.095: OSC3.6@70.459,66.187 OSC3.6@71.161,65.485
  TopLayer w0.5: L37.2@71.011,59.05 71.211,59.25 71.211,60.8 C290.2@71.211,62.3 C291.2@71.211,63.3 71.211,65.435 OSC3.6@71.161,65.485
NetC382_2: C382.2 IC14.25 | length 2.1
  TopLayer w0.3: C382.2@76.886,1.325 77.061,1.5 77.228,1.5 77.911,2.183 IC14.25@77.911,2.913
NetC391_2: C391.2 IC23.25 | length 2.4
  TopLayer w0.3: C391.2@104.118,3.9 104.118,3.932 104.436,4.25 104.468,4.25 105.111,4.893 IC23.25@105.111,5.838
NetC397_1: C397.1 R93.1 R260.1 T24.1 | length 3.6
  BottomLayer w0.127: R93.1@154.761,3.059 C397.1@155.736,3.059 ; C397.1@155.736,3.039 C397.1@155.736,3.059 ; T24.1@155.911,4.625 155.736,4.45 C397.1@155.736,3.059 ; R260.1@156.711,3.065 156.705,3.059 C397.1@155.736,3.059
NetC398_1: C398.1 R259.1 T5.3 T23.3 | length 10.8
  TopLayer w0.127: v1(159.546,3.777) 159.607,3.777 159.853,3.531 C398.1@160.8,3.531 160.809,3.54 v1(160.809,4.834)
  BottomLayer w0.127: T5.3@154.261,5.625 156.57,5.625 158.418,3.777 v1(159.546,3.777) ; R259.1@159.486,5.555 159.506,5.575 T23.3@160.761,5.575 160.809,5.527 v1(160.809,4.834)
NetC398_2: C398.2 R260.2 | length 2.5
  TopLayer w0.127: v1(157.8,2.142) C398.2@157.8,3.531
  BottomLayer w0.127: R260.2@156.711,2.125 157.783,2.125 v1(157.8,2.142)
NetC399_2: C399.2 IC33.14 R273.2 | length 2.6
  TopLayer w0.095: C399.2@180.986,76.35 181.011,76.35 181.211,76.15 181.566,76.15 181.624,76.208 181.624,76.228 181.866,76.47 181.906,76.47 182.149,76.228 182.149,76.208 182.24,76.116 182.678,76.116 182.787,76.225 IC33.14@183.111,76.225
NetC400_2: C400.2 IC33.15 R273.1 | length 2.4
  TopLayer w0.095: C400.2@180.986,75.65 181.139,75.803 181.202,75.803 181.219,75.82 181.576,75.82 181.769,75.628 182.004,75.628 182.204,75.828 182.678,75.828 182.781,75.725 IC33.15@183.111,75.725
NetC404_2: C404.2 IC33.17 | length 2.2
  TopLayer w0.095: C404.2@180.986,74.575 181.136,74.725 IC33.17@183.111,74.725
NetD2_5: D2.5 J23.1 L22.1 R200.1 | length 40.4
  TopLayer w0.15: L22.1@9.912,77.94 10.021,78.05 12.558,78.05 14.259,76.349 16.061,76.349 16.996,75.414 16.996,74.063 16.811,73.878 16.811,71.693 R200.1@17.6,70.904
  TopLayer w0.25: v1(2.176,68.771) 2.181,68.765 D2.5@2.181,67.984
  TopLayer w0.4: J23.1@-2.035,63.3 2.11,63.3 3.511,64.701 3.511,65.98 4.807,67.277 4.807,68.461 v1(4.813,68.466) 4.813,71.673 4.511,71.975 4.511,75 7.451,77.94 L22.1@9.912,77.94
  Layer 3 w0.25: v1(2.176,68.771) 4.508,68.771 v1(4.813,68.466)
NetD3_1: D3.1 J14.F2 R278.2 | length 36.8
  TopLayer w0.125: 180.586,6.59 181.487,7.491 183.633,7.491 184.603,8.461 185.024,8.461 185.044,8.441 185.213,8.441 v2(185.284,8.369)
  TopLayer w0.127: R278.2@179.176,6.338 179.192,6.321 179.832,6.321 180.101,6.59 180.586,6.59
  Layer 5 w0.1: v1(184.754,8.984) 185.283,8.984 185.608,8.659 185.608,6.999 186.529,6.079 187.205,6.079 193.061,0.223 207.173,0.223 J14.F2@207.9,0.95
  BottomLayer w0.125: D3.1@184.146,8.55 184.234,8.463 184.476,8.463 184.539,8.4 185.254,8.4 v2(185.284,8.369) ; D3.1@184.423,8.637 184.754,8.968 v1(184.754,8.984)
NetD3_3: D3.3 J14.H3 R282.2 | length 31.3
  TopLayer w0.125: R282.2@179.176,3.641 181.562,3.641 v2(184.476,6.554)
  Layer 5 w0.1: v1(186.097,7.16) 187.177,7.16 192.487,1.85 203.9,1.85 J14.H3@205,2.95
  BottomLayer w0.125: v2(184.476,6.554) 184.146,6.884 D3.3@184.146,7.55 185.633,7.55 186.022,7.16 v1(186.097,7.16)
NetD3_4: D3.4 J14.E2 R277.2 | length 37
  Layer 5 w0.1: v1(182.841,6.836) 185.627,4.05 188.401,4.05 192.701,-0.25 208.1,-0.25 J14.E2@209.3,0.95
  BottomLayer w0.127: R277.2@179.331,4.35 179.331,4.33 179.557,4.103 179.577,4.103 179.781,3.9 181.403,3.9 181.95,4.447 181.95,6.405 182.286,6.741 182.286,7.358 D3.4@182.424,7.495 ; D3.4@182.626,7.55 182.661,7.515 182.661,7.284 182.826,7.119 182.826,6.851 v1(182.841,6.836)
NetD3_6: D3.6 J14.L2 R286.2 | length 27.7
  TopLayer w0.127: R286.2@179.176,4.989 179.675,4.989 v2(180.061,5.375)
  layer 8 w0.127: v2(182.649,9.683) 183.013,9.319 184.574,9.319 184.603,9.348 184.904,9.348 184.933,9.319 185.96,9.319 193.029,2.25 197.114,2.25 198.414,0.95 J14.L2@199.5,0.95
  BottomLayer w0.125: D3.6@182.649,8.573 v2(182.649,9.683)
  BottomLayer w0.127: v2(180.061,5.375) 180.061,6.006 181.185,7.13 181.185,8.228 181.647,8.689 182.322,8.689 182.461,8.55 D3.6@182.626,8.55
NetD5_1: D5.1 J14.H2 R281.2 | length 32.5
  TopLayer w0.127: R281.2@179.176,11.731 179.693,11.731 180.599,12.637 183.796,12.637 v2(184.138,12.294)
  BottomLayer w0.1: 192.055,8.795 198.75,2.1 203.95,2.1 J14.H2@205.1,0.95
  BottomLayer w0.127: v2@184.146,12.286 D5.1@184.146,11.709 184.159,11.696 185.61,11.696 186.058,11.248 186.058,9.523 186.57,9.012 191.838,9.012 192.055,8.795
NetD5_3: D5.3 J14.I2 R283.2 | length 30.4
  TopLayer w0.125: R283.2@179.176,7.686 179.873,7.686 181.216,9.029 182.822,9.029 183.59,9.797 v2(183.59,9.833)
  TopLayer w0.127: R283.2@179.176,7.686 179.176,7.666 R283.2@179.402,7.439
  BottomLayer w0.1: 187.483,7.495 191.426,7.495 197.141,1.781 202.869,1.781 J14.I2@203.7,0.95
  BottomLayer w0.125: v2(183.59,9.833) 184.146,10.389 D5.3@184.146,10.709 ; D5.3@184.374,10.709 184.735,10.709 184.899,10.545 184.899,10.08 186.502,8.477
  BottomLayer w0.127: 186.502,8.477 187.483,7.495
NetD5_4: D5.4 J14.K3 R285.2 | length 26.6
  TopLayer w0.125: R285.2@179.176,9.034 179.176,9.054 179.789,9.667 179.789,10.011 180.17,10.391 181.169,10.391 v1(181.531,10.029)
  TopLayer w0.127: R285.2@179.176,9.034 R285.2@179.216,8.994
  Layer 5 w0.1: v2(182.956,10.258) 183.243,10.545 189.178,10.545 195.973,3.75 200,3.75 J14.K3@200.8,2.95
  BottomLayer w0.125: v1(181.531,10.029) 181.56,10.058 181.801,10.058 182.364,10.621 182.374,10.621 182.452,10.7 D5.4@182.452,10.709
  BottomLayer w0.127: D5.4@182.452,10.709 182.86,10.709 182.878,10.691 182.878,10.437 182.956,10.359 v2(182.956,10.258)
NetD5_6: D5.6 J14.J3 R284.2 | length 31.2
  TopLayer w0.127: R284.2@179.176,10.383 179.402,10.609 179.402,10.641 180.58,11.819 v1(181.376,11.819)
  Layer 5 w0.1: v2(182.653,12.223) 182.058,11.628 182.058,9.577 182.397,9.237 184.512,9.237 184.609,9.334 186.177,9.334 193.361,2.15 201.4,2.15 J14.J3@202.2,2.95
  BottomLayer w0.127: v1(181.376,11.819) 181.872,11.819 181.982,11.709 D5.6@182.626,11.709 182.653,11.736 v2(182.653,12.223)
NetD6_1: D6.1 J33.C8 R288.2 | length 35.9
  Layer 5 w0.1: v1(185.161,21.495) 185.166,21.491 185.762,21.491 189.267,24.996 211.146,24.996 J33.C8@212.1,25.95
  BottomLayer w0.125: R288.2@179.331,20.45 179.331,20.47 179.558,20.697 179.578,20.697 180.631,21.75 181.967,21.75 182.275,22.058 183.775,22.058 184.146,21.687 D6.1@184.146,21.132 ; D6.1@184.39,21.103 184.699,21.103 185.091,21.495 v1(185.161,21.495)
NetD6_3: D6.3 J33.J7 R270.2 | length 27
  Layer 5 w0.1: v1(186.834,19.95) 189.88,22.996 201.246,22.996 J33.J7@202.2,23.95
  BottomLayer w0.125: R270.2@179.331,16.411 179.558,16.638 179.558,16.727 179.563,16.731 179.563,17.129 180.314,17.881 180.314,18.555 181.058,19.299 183.973,19.299 184.146,19.472 D6.3@184.146,20.132 ; D6.3@184.385,20.156 185.439,20.156 185.645,19.95 v1(186.834,19.95)
NetD6_4: D6.4 J33.B8 R287.2 | length 38.6
  Layer 5 w0.1: 186.725,21.133 190.342,24.75 212.3,24.75 J33.B8@213.5,25.95
  Layer 5 w0.125: v1(183.302,19.682) 183.321,19.7 183.321,19.961 184.492,21.133 186.725,21.133
  BottomLayer w0.125: R287.2@179.331,17.757 179.331,17.777 179.971,18.417 179.971,18.992 181.117,20.138
  BottomLayer w0.127: R287.2@179.557,17.504 R287.2@179.577,17.504 ; 181.117,20.138 D6.4@182.62,20.138 ; D6.4@182.626,20.132 182.648,20.11 182.648,19.866 182.832,19.682 v1(183.302,19.682)
NetD6_6: D6.6 J33.E7 R267.2 | length 34.1
  TopLayer w0.1: v1(196.961,21.75) 197.427,21.75 198.602,22.925 208.175,22.925 J33.E7@209.2,23.95
  Layer 6 w0.1: v1(182.617,21.658) 182.617,21.653 184.795,19.475 194.686,19.475 v1(196.961,21.75)
  BottomLayer w0.125: R267.2@179.331,19.104 179.554,19.327 179.554,19.495 180.511,20.452
  BottomLayer w0.127: 180.511,20.452 181.191,21.132 D6.6@182.626,21.132 182.617,21.141 v1(182.617,21.658)
NetD7_1: D7.1 J14.C3 R276.2 | length 42.6
  TopLayer w0.127: R276.2@179.176,15.776 180.707,15.776 181.502,14.98 183.687,14.98 v1(184.068,15.361)
  layer 8 w0.1: v1(186.86,9.375) 193.36,2.875 197.45,2.875 198.475,1.85 211.761,1.85 212,2.089 J14.C3@212,2.95
  BottomLayer w0.125: v1(184.068,15.361) 184.069,15.36 184.069,14.858 185.557,14.858 186.322,14.092
  BottomLayer w0.127: 186.322,14.092 186.86,13.555 v1(186.86,9.375)
NetD7_3: D7.3 J33.K7 R272.2 | length 38
  Layer 5 w0.1: v1(185.45,13.45) 184.895,12.895 182.916,12.895 181.59,14.221 181.59,16.516 185.396,20.323 186.456,20.323 189.356,23.223 200.073,23.223 J33.K7@200.8,23.95
  BottomLayer w0.125: R272.2@179.331,9.65 179.331,9.67 179.971,10.31 179.971,11.137 181.47,12.636 183.415,12.636 184.137,13.358 184.137,13.753 184.225,13.841 184.999,13.841 185.389,13.45 v1(185.45,13.45)
NetD7_4: D7.4 J14.G3 R280.2 | length 32.9
  TopLayer w0.127: R280.2@179.176,13.079 179.181,13.084 v1(181.616,13.084)
  Layer 5 w0.1: v2(183.302,13.326) 184.36,13.326 184.926,13.892 188.019,13.892 197.861,4.05 205.3,4.05 J14.G3@206.4,2.95
  BottomLayer w0.127: v1(181.616,13.084) 181.643,13.084 182.312,13.754 182.626,13.754 D7.4@182.65,13.754 ; D7.4@182.626,13.841 182.65,13.817 D7.4@182.65,13.754 ; D7.4@182.867,13.754 D7.4@182.65,13.754 ; v2@183.298,13.322 182.907,13.322 182.65,13.579 D7.4@182.65,13.754
NetD7_5: D7.5 J33.A7 R262.2 | length 48.7
  Layer 5 w0.1: 193.635,16.224 194.361,16.95 215.461,16.95 216.361,17.85 216.361,23.15 215.561,23.95 J33.A7@214.8,23.95
  Layer 5 w0.125: v1(181.966,14.491) 184.048,14.491 185.782,16.224 193.635,16.224
  BottomLayer w0.125: R262.2@179.331,11.05 179.331,11.07 180.716,12.455 180.716,13.046 181.802,14.132 182.217,14.132 182.338,14.253 182.539,14.253 D7.5@182.626,14.341 182.461,14.341 182.311,14.491 v1(181.966,14.491)
NetD7_6: D7.6 J14.F3 R279.2 | length 38.1
  TopLayer w0.127: R279.2@179.176,14.428 v2(181.19,14.428)
  layer 8 w0.1: v1(187.699,9.871) 187.722,9.849 187.722,9.23 193.877,3.075 197.813,3.075 198.788,2.1 207.584,2.1 207.734,2.25 207.734,2.884 J14.F3@207.8,2.95
  BottomLayer w0.1: D7.6@182.626,14.841 182.652,14.867 182.652,15.082 183.281,15.711 185.612,15.711 187.312,14.011 187.312,10.258 v1(187.699,9.871)
  BottomLayer w0.127: v2(181.19,14.428) 181.291,14.428 181.422,14.558 181.429,14.558 181.729,14.858 182.443,14.858 D7.6@182.485,14.9
NetD8_1: D8.1 J33.D7 R266.2 | length 48
  Layer 5 w0.1: 193.002,18.691 195.261,20.95 215.361,20.95 215.761,21.35 215.761,22.35 215.261,22.85 211.7,22.85 J33.D7@210.6,23.95
  Layer 5 w0.125: v1(185.38,18.154) 192.465,18.154 193.002,18.691
  BottomLayer w0.125: R266.2@179.331,15.064 179.331,15.084 180.061,15.814 180.061,16.539 180.583,17.061 ; 183.379,18.953 183.699,18.953 184.146,18.506 D8.1@184.146,17.986 184.774,17.986 184.941,18.154 v1(185.38,18.154)
  BottomLayer w0.127: 180.583,17.061 180.583,18.125 181.41,18.953 183.379,18.953
NetD8_3: D8.3 J33.B7 R263.2 | length 46.7
  Layer 5 w0.1: v1(185.365,16.966) 192.877,16.966 194.861,18.95 215.361,18.95 216.061,19.65 216.061,22.65 215.561,23.15 214.2,23.15 J33.B7@213.4,23.95
  BottomLayer w0.125: R263.2@179.331,12.371 179.331,12.391 180.769,13.83 180.769,14.925 181.861,16.017 183.535,16.017 184.115,16.597 D8.3@184.115,16.89 ; D8.3@184.146,16.986 184.159,16.999 185.332,16.999 v1(185.365,16.966)
NetD8_4: D8.4 J33.H7 R269.2 | length 29.5
  TopLayer w0.127: R269.2@179.176,17.124 179.209,17.158 181.021,17.158 181.201,16.978 v2(181.282,16.978)
  Layer 5 w0.1: 185.171,18.966 191.677,18.966 195.461,22.75 203.8,22.75 J33.H7@205,23.95
  Layer 5 w0.125: v2(182.669,16.464) 185.171,18.966
  BottomLayer w0.127: v2(181.282,16.978) 181.29,16.986 D8.4@182.626,16.986 182.669,16.944 v2(182.669,16.464)
NetD8_5: D8.5 J33.G7 R268.2 | length 35.4
  TopLayer w0.1: v1(196.961,22.35) 196.906,22.405 196.906,23.495 198.305,24.894 205.456,24.894 J33.G7@206.4,23.95
  TopLayer w0.127: R268.2@179.176,18.469 180.402,18.469 181.274,17.597 v2(181.274,17.592)
  Layer 6 w0.1: v2(181.8,17.866) 181.8,21.412 182.431,22.044 196.248,22.044 196.554,22.35 v1(196.961,22.35)
  BottomLayer w0.125: v2(181.274,17.592) 181.308,17.592 181.578,17.322 182.297,17.322 182.461,17.486 182.374,17.574 182.288,17.574 182.068,17.795 181.871,17.795 v2(181.8,17.866)
NetD8_6: D8.6 J33.J8 R271.2 | length 32.6
  Layer 5 w0.1: v1(182.602,18.531) 182.602,18.566 182.361,18.807 182.361,21.133 182.536,21.308 182.762,21.308 184.944,23.491 184.944,23.567 187.127,25.75 197.861,25.75 198.388,25.223 201.573,25.223 J33.J8@202.3,25.95
  BottomLayer w0.125: 180.865,16.966 180.865,17.422 180.861,17.426 180.861,17.841 181.402,18.381 182.057,18.381 182.364,18.074 182.533,18.074 D8.6@182.602,18.005 ; v1(182.602,18.531) 182.602,18.01 D8.6@182.626,17.986
  BottomLayer w0.127: R271.2@179.331,13.718 179.331,13.738 179.557,13.964 179.577,13.964 180.41,14.797 180.41,15.208 180.865,15.663 180.865,16.966
NetD18_2: D18.2 J21.1 T20.3 | length 8.3
  TopLayer w0.3: J21.1@160.338,12.895 164.256,12.895 D18.2@164.336,12.975
  BottomLayer w0.3: T20.3@156.661,11.45 156.861,11.45 158.306,12.895 J21.1@160.338,12.895
NetIC1_24: IC1.24 R8.1 | length 1.3
  BottomLayer w0.19: R8.1@31.186,63.08 31.361,62.905 IC1.24@31.361,61.878
NetIC1_26: IC1.26 R7.1 | length 1.2
  BottomLayer w0.19: R7.1@32.336,63.08 32.361,63.055 IC1.26@32.361,61.878
NetIC2_1: IC2.1 R22.2 | length 4.1
  BottomLayer w0.2: R22.2@20.102,50.446 20.122,50.446 20.312,50.636 20.312,50.656 21.906,52.25 22.249,52.25 22.483,52.484 IC2.1@22.483,53.299
NetIC2_6: IC2.6 Q1.3 TP1.1 | length 10.2
  TopLayer w0.3: TP1.1@11.911,53.3 13.785,53.3 Q1.3@13.795,53.29 15.685,51.4 18.986,51.4 v2(19.975,52.389)
  BottomLayer w0.3: v2(19.975,52.389) 19.983,52.397 IC2.6@19.983,53.299
NetIC2_7: IC2.7 Q1.1 | length 5.2
  TopLayer w0.3: Q1.1@15.995,54.945 16.363,54.577 16.918,54.577 v2@19.076,52.419
  BottomLayer w0.3: v2(19.086,52.389) 19.483,52.786 IC2.7@19.483,53.299
NetIC2_18: IC2.18 T1.1 | length 9.7
  BottomLayer w0.2: T1.1@13.251,66.012 13.451,66.012 15.161,64.302 15.161,62.725 16.348,61.538 16.348,60.663 17.583,59.428 IC2.18@17.583,58.199
NetIC2_21: IC2.21 R17.2 | length 1.4
  BottomLayer w0.2: IC2.21@19.483,59.099 19.461,59.121 19.461,60.445 R17.2@19.483,60.467
NetIC2_22: IC2.22 R237.2 | length 15.8
  Layer 5 w0.125: v1(19.886,59.875) 20.484,60.473 23.713,60.473 24.38,59.806 24.38,59.242 27.712,55.91 v2(27.712,51.799)
  BottomLayer w0.125: IC2.22@19.961,59.121 v1@19.961,59.8 ; R237.2@27.712,51.07 v2(27.712,51.799)
NetIC2_23: IC2.23 R236.2 | length 13.1
  Layer 5 w0.125: v1(20.467,59.861) 21.828,58.5 22.856,58.5 22.86,58.496 23.224,58.496 23.228,58.5 23.461,58.5 26.711,55.25 v2(26.711,51.825)
  BottomLayer w0.125: v1(20.467,59.861) 20.483,59.845 IC2.23@20.483,59.099 ; R236.2@26.711,51.07 v2(26.711,51.825)
NetIC3_3: IC3.3 R54.2 | length 1.4
  TopLayer w0.2: R54.2@56.731,58.05 56.731,58.07 56.921,58.26 56.998,58.26 57.038,58.3 IC3.3@58.011,58.3
NetIC3_6: IC3.6 R248.1 R251.2 | length 2.2
  TopLayer w0.2: R251.2@60.511,56.02 60.531,56.02 60.721,56.21 60.721,56.23 61.011,56.52 ; IC3.6@61.011,57.3 61.011,56.52 ; R248.1@61.511,56.02 61.491,56.02 61.301,56.21 61.301,56.23 61.011,56.52
NetIC4_AH22: IC4.AH22 R160.1 | length 1.4
  TopLayer w0.254: IC4.AH22@146.061,33.95 v1(146.561,33.45)
  BottomLayer w0.254: R160.1@146.231,33.95 146.251,33.95 146.334,33.867 146.334,33.717 146.561,33.49 v1(146.561,33.45)
NetIC4_AN4: IC4.AN4 R292.1 | length 34.6
  TopLayer w0.095: v1(127.561,28.45) IC4.AN4@128.061,28.95
  TopLayer w0.127: v2(151.608,15.182) 152.338,15.182 R292.1@152.362,15.206
  Layer 5 w0.127: v1(127.561,28.45) 127.086,27.975 127.086,26.8 127.336,26.55 127.336,23.29 131.997,18.629 139.872,18.629 143.319,15.182 v2(151.608,15.182)
NetIC4_G22: IC4.G22 R161.1 | length 1.4
  TopLayer w0.4: IC4.G22@146.061,54.95 v1(146.561,55.45)
  BottomLayer w0.254: v1(146.561,55.45) 146.561,55.41 146.788,55.183 146.788,55.033 146.871,54.95 R161.1@146.891,54.95
NetIC4_N11: IC4.N11 R52.2 | length 11.8
  TopLayer w0.095: v1(134.561,49.45) IC4.N11@135.061,48.95
  BottomLayer w0.095: R52.2@131.782,57.154 132.023,56.912 132.023,56.892 133.069,55.847 133.069,53.412 133.606,52.875 134.836,52.875 135.121,52.59 135.121,52.36 135.406,52.076 135.465,52.076 136.036,51.505 136.036,50.395 135.542,49.902 135.013,49.902 v1(134.561,49.45)
NetIC6_3: IC6.3 R21.2 | length 2.6
  TopLayer w0.1: IC6.3@136.786,5.417 137.653,5.417 137.902,5.666 137.902,6.091 138.215,6.404 R21.2@138.721,6.404
NetIC6_4: IC6.4 R27.2 | length 2.9
  TopLayer w0.1: IC6.4@136.823,6.055 137.541,6.055 137.861,6.375 137.861,7.175 138.022,7.336 R27.2@138.721,7.336
NetIC6_6: IC6.6 IC6.18 R16.1 R24.2 | length 24.2
  TopLayer w0.127: v2(129.775,6.708) 129.78,6.713 130.857,6.713 IC6.18@130.861,6.717 ; IC6.6@136.786,7.375 137.386,7.375 138.283,8.272 144.183,8.272 146.283,10.372 R24.2@146.283,11.905 146.303,11.925 R16.1@146.303,12.835
  Layer 3 w0.127: v2(129.775,6.708) 130.344,6.708 131.99,8.354 135.671,8.354 135.753,8.272 v2(138.954,8.272)
NetIC6_11: IC6.11 IC6.12 | length 1.9
  TopLayer w0.16: IC6.12@133.499,8.705 133.541,8.747 133.541,9.294 133.672,9.425 133.973,9.425 134.105,9.293 134.105,8.748 IC6.11@134.149,8.705